# Altium PCB VCB2020.PcbDoc (part 1 of 3)
Units mm, origin at the board's own origin, x right, y up, seen from the top; angles counter-clockwise.
Board outline 146 x 96 mm, 2 copper layers (Top Layer, Bottom Layer); 155 components, 105 nets, 540 pads, 1006 vias.
Unrouted connection lines stored in the file: 5.
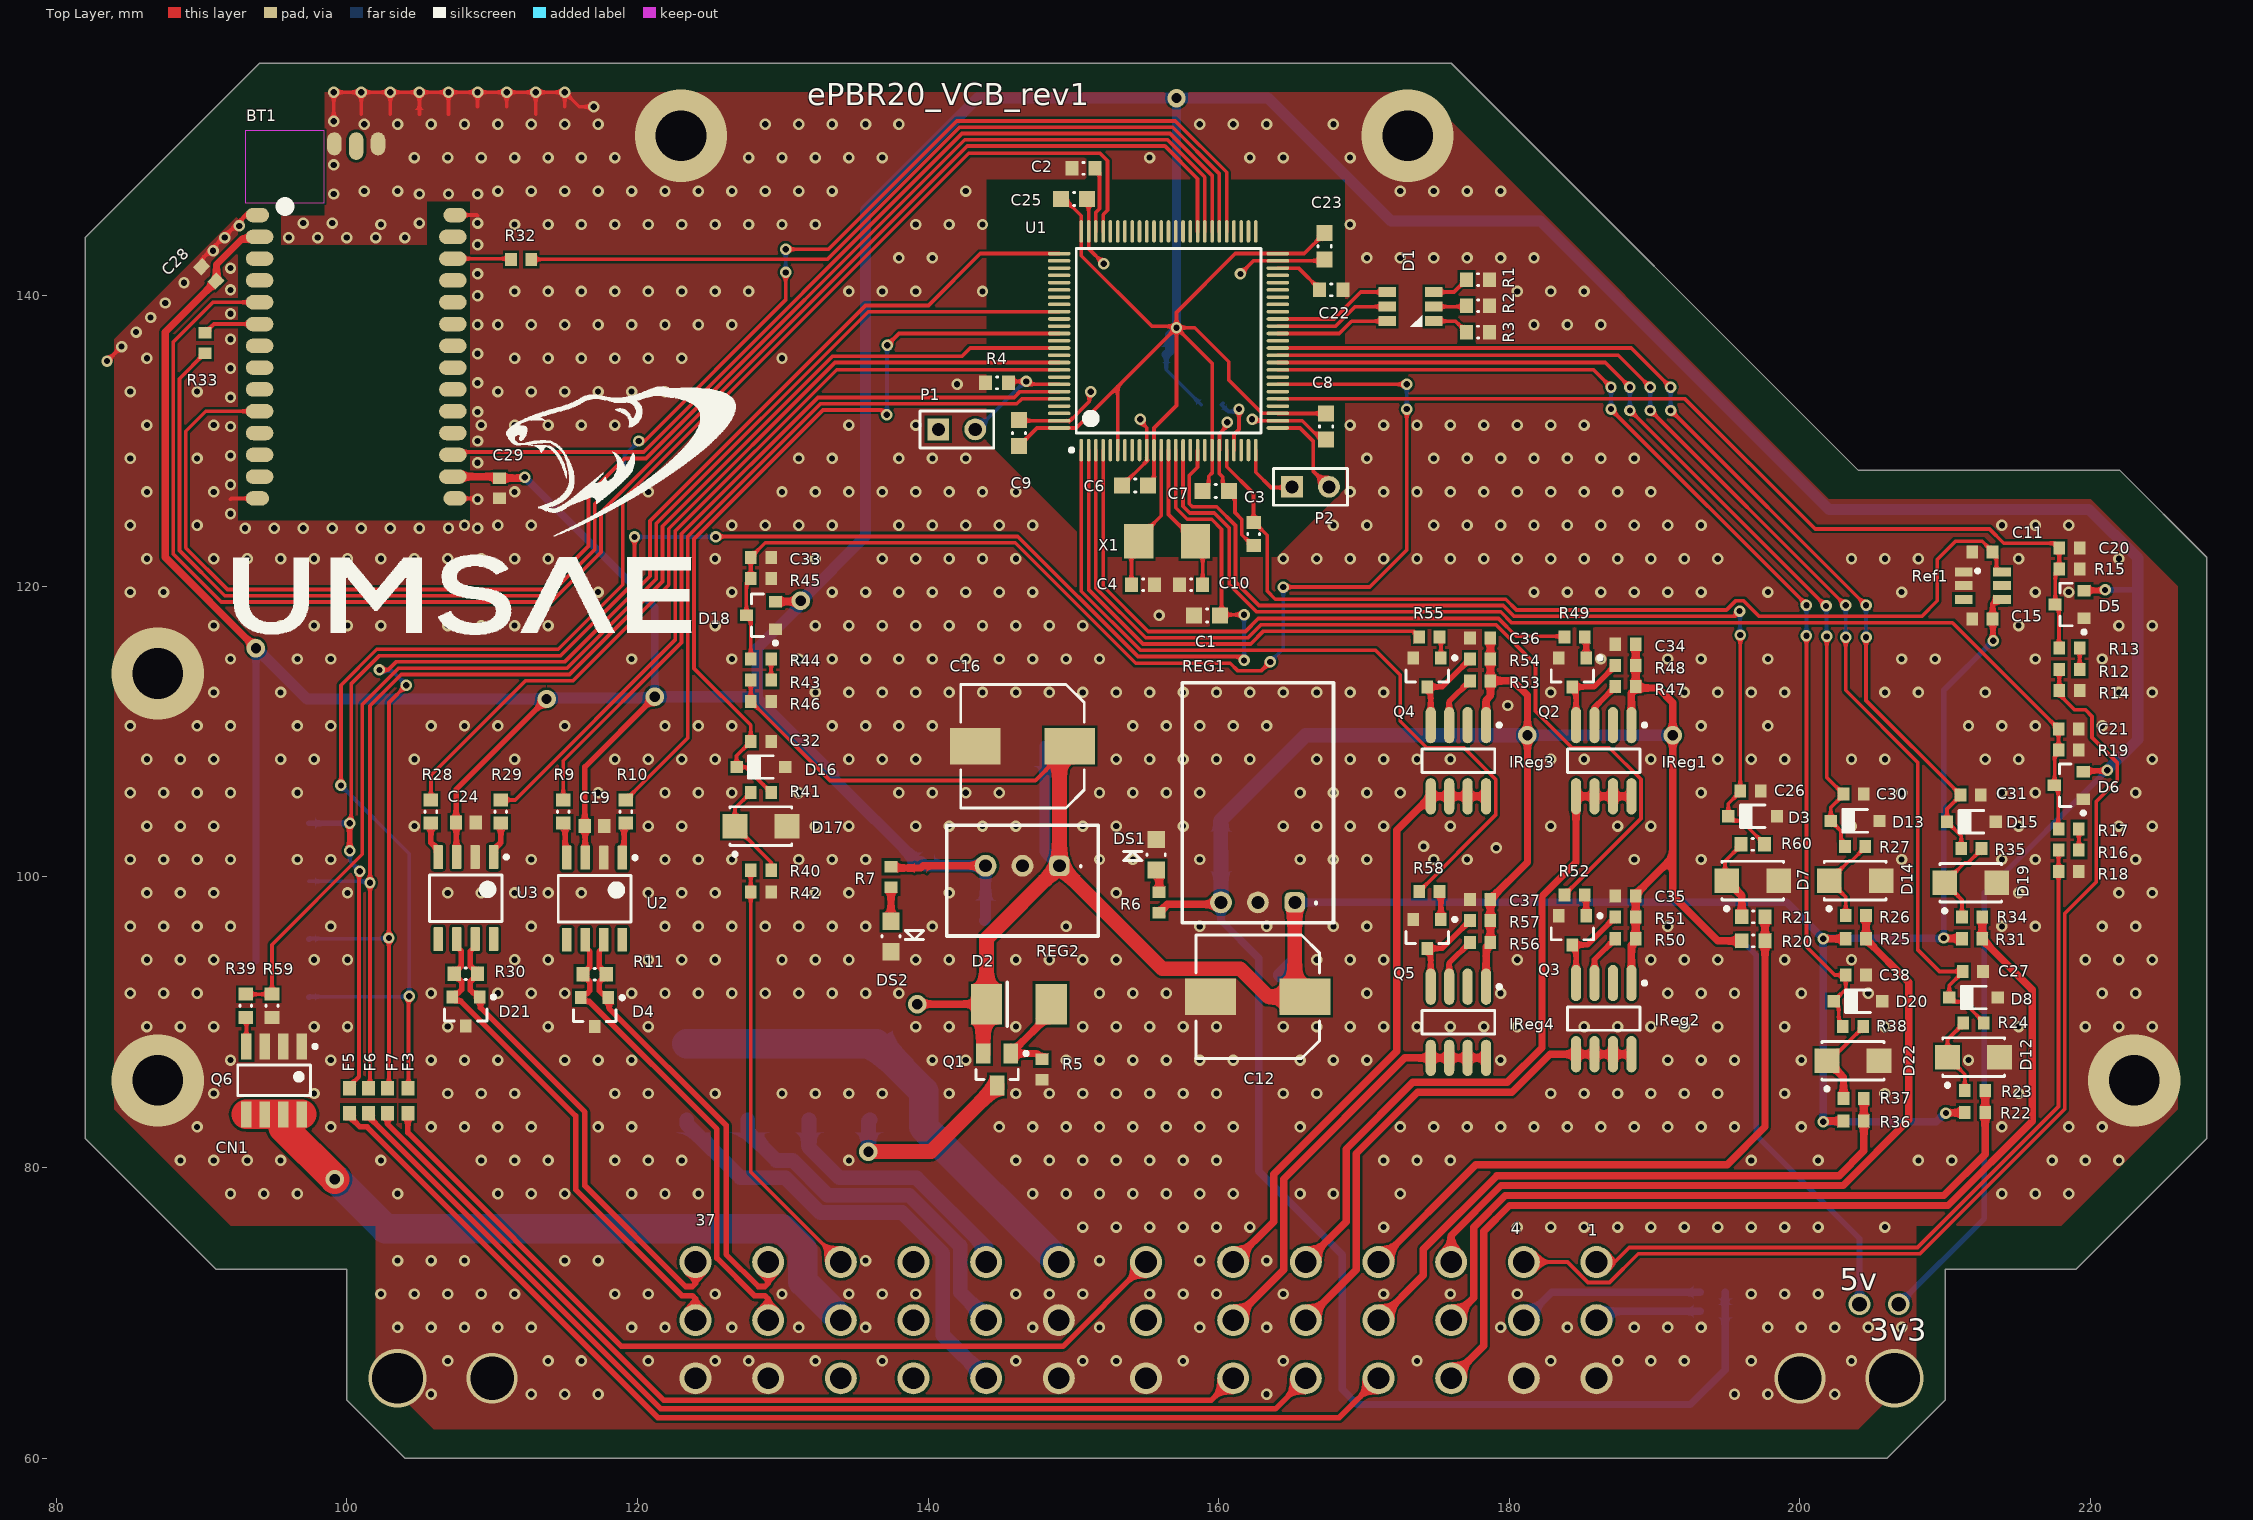
[diagram p0: Top Layer view]
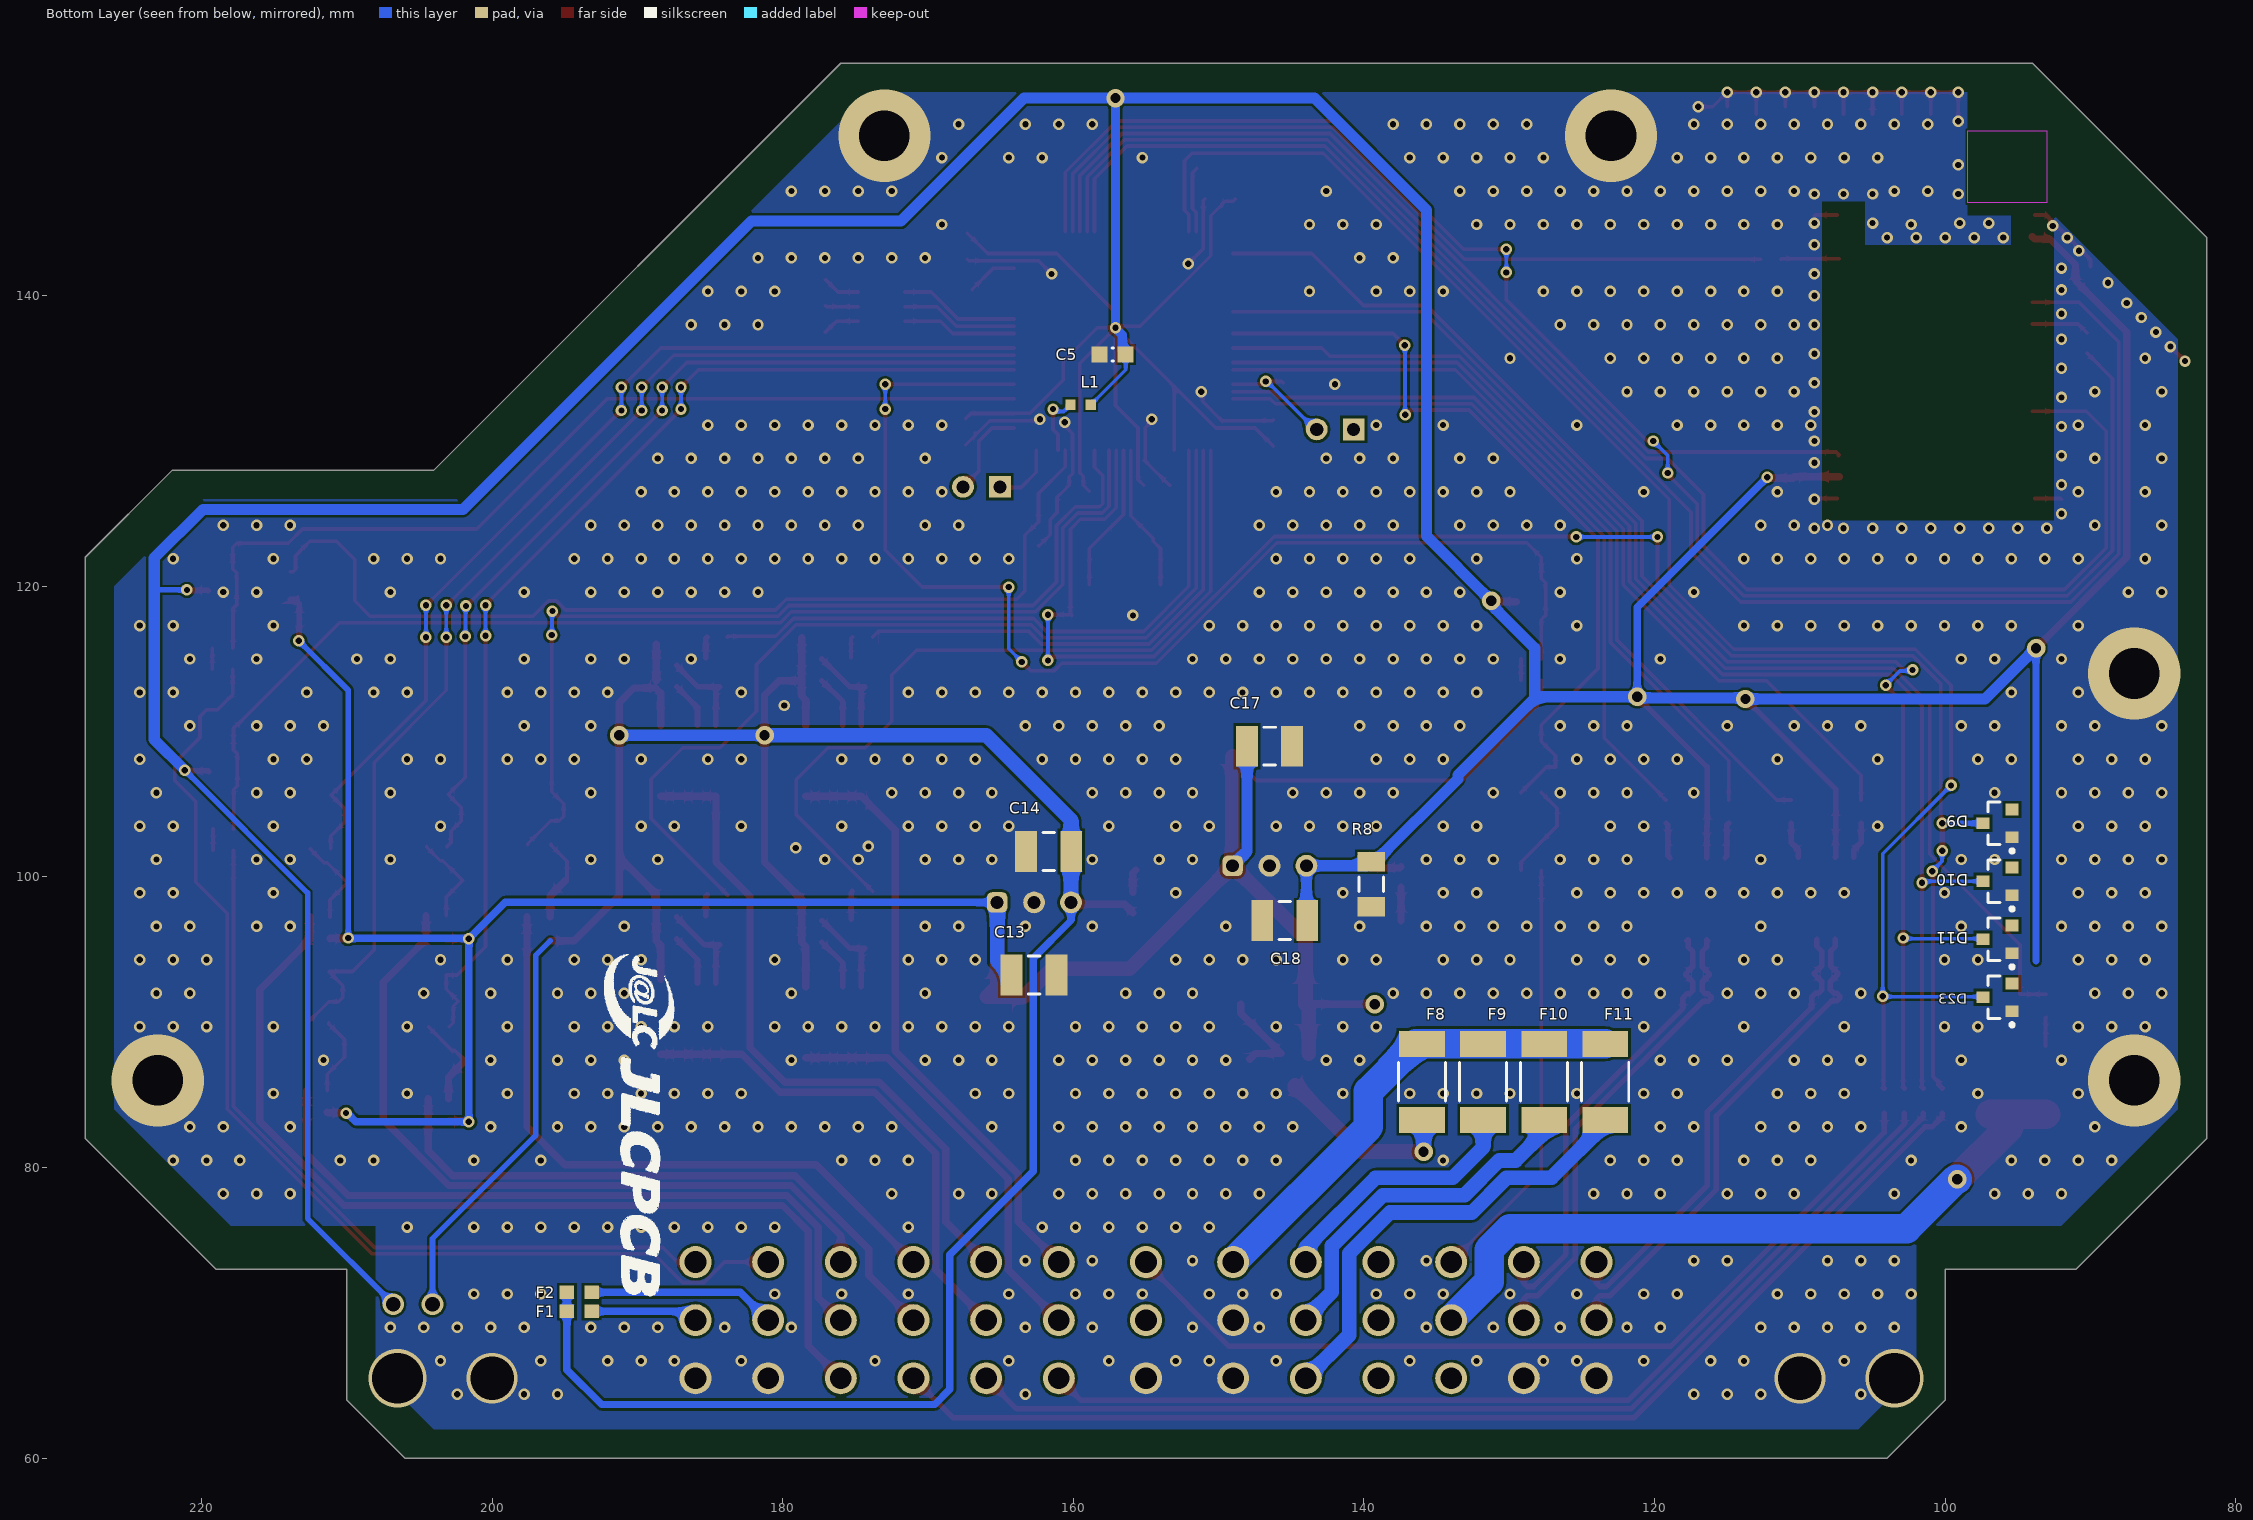
[diagram p1: Bottom Layer view, seen from below]

## Layer stack, top to bottom
Top Solder: solder mask 0.0102, Solder Resist, Dk 3.5
Top Layer: signal copper 0.0356
Dielectric 1: dielectric 0.32, FR-4, Dk 4.8
Bottom Layer: signal copper 0.0356
Bottom Solder: solder mask 0.0102, Solder Resist, Dk 3.5

## Board outline
98.5,156 94,156 82,144 82,82 91,73 100,73 100,64 104,60 206,60 210,64 210,73 219,73 228,82 228,122 222,128 204,128 176,156

## Design rules (kind name [scope] priority, off if disabled: settings)
Clearance [All] p1: gap=0.178 ignorepadtopadclearanceinfootprint=FALSE except(0: Arc-Hole Track-Hole SMDPad-Hole THPad-Hole Via-Hole Fill-Hole Poly-Hole Region-Hole Text-Hole)
DiffPairsRouting [All] p1: maxlimit=0.254 minlimit=0.254 mostfreqgap=0.254 toplayer_minwidth=0.381 toplayer_maxwidth=0.381 toplayer_prefwidth=0.381 bottomlayer_minwidth=0.381 bottomlayer_maxwidth=0.381 bottomlayer_prefwidth=0.381 maxuncoupledlength=12.7
Height [All] p1: minheight=0 maxheight=1000 prefheight=12.7
HoleSize [All] p1: absolutevalues=TRUE maxlimit=5.08 minlimit=0.381 maxpercent=80.000 minpercent=20.000
HoleToHoleClearance [All] p1: gap=0.203 allowstackedmicrovias=TRUE
MinimumAnnularRing MinimumAnnularRing_Pad [IsPad] p1: minimumring=0.178
MinimumAnnularRing MinimumAnnularRing_Via [IsVia] p2: minimumring=0.127
MinimumSolderMaskSliver [All] p1: minsoldermaskwidth=0.102
PlaneClearance [All] p1: clearance=0.381
PlaneConnect PlaneConnect_12V [InNet('12V')] p1: planeconnectstyle=Direct reliefexpansion=0.508 reliefentries=4 reliefconductorwidth=0.508 reliefairgap=0.254
PlaneConnect PlaneConnect_1 [All] p2: planeconnectstyle=Relief reliefexpansion=0.381 reliefentries=4 reliefconductorwidth=0.381 reliefairgap=0.254
PolygonConnect [All] p1: connectstyle=Direct reliefconductorwidth=0.381 reliefentries=4 polygonreliefangle="90 Angle" airgapwidth=0.254
RoutingVias [All] p1: holewidth=0.432 width=0.787 viastyle="Through Hole" minholewidth=0.381 minwidth=0.737 maxholewidth=1.27 maxwidth=2.54
SilkToSilkClearance [All] p1: silktosilkclearance=0.178
SilkToSolderMaskClearance [IsPad] p1: minsilkscreentomaskgap=0.051 clearancetoexposedcopper=TRUE
SolderMaskExpansion [All] p1: expansion=0.076
Width [All] p1: maxlimit=5.08 minlimit=0.178 preferedwidth=0.381
21 further rules are at their usual default settings.

## Classes and differential pairs
component class 14-RegenSolenoid: Q6 R39 R59
component class 13-Fusing: F8 F9 F10 F11
component class 12-Dash_Inputs: C27 C30 C31 C38 D8 D12 D13 D14 D15 D19 D20 D22 R22 R23 R24 R25 R26 R27 R31 R34 R35 R36 R37 R38
component class 10-DashLEDs: C34 C35 C36 C37 IReg1 IReg2 IReg3 IReg4 Q2 Q3 Q4 Q5 R47 R48 R49 R50 R51 R52 R53 R54 R55 R56 R57 R58
component class 9-Other_Inputs: C26 C32 C33 D3 D7 D16 D17 D18 R20 R21 R40 R41 R42 R43 R44 R45 R46 R60
component class 8-Bluetooth: BT1 C28 C29 R32 R33
component class 5-Connector: CN1 D9 D10 D11 F1 F2 F5 F6 F7
component class 4-PPS: C20 C21 D5 D6 R12 R13 R14 R15 R16 R17 R18 R19
component class 3-CAN: C19 C24 D4 D21 R9 R10 R11 R28 R29 R30 U2 U3
component class 2-Power: C11 C12 C13 C14 C15 C16 C17 C18 D2 DS1 DS2 Q1 R5 R6 R7 R8 Ref1 REG1 REG2
component class 1-Controller: C1 C2 C3 C4 C5 C6 C7 C8 C9 C10 C22 C23 C25 D1 L1 P1 P2 R1 R2 R3 R4 U1 X1
differential pair Sensor_CAN: +Sensor_CAN_P -Sensor_CAN_N
differential pair CAN: +CAN_P -CAN_N

## Components (designator, comment, footprint, x,y, rotation, side; value= is the part's Value field where it differs from the comment)
BT1 "WT12" WT12 100.65,142.95 r270 top
C1 "CAP 10nF 100V 0603(1608)" CAPC0603(1608)100_M 159.2,117.996 r0 top value=10nF
C2 "CAP 2.2uF" CAPC0603(1608)55_N 150.7,148.759 r0 top value=2.2uF
C3 "CAP 100nF 25V 0603(1608)" CAPC0603(1608)100_N 162.4,123.6 r90 top value=100nF
C4 "CAP 24pF" CAPC0603(1608)100_N 154.796,120.1 r180 top value=24pF
C5 "CAP 10nF 100V 0603(1608)" CAPC0603(1608)100_M 157.3,135.95 r180 bottom value=10nF
C6 "CAP 10nF 100V 0603(1608)" CAPC0603(1608)100_M 154.25,126.95 r0 top value=10nF
C7 "CAP 10nF 100V 0603(1608)" CAPC0603(1608)100_M 159.8,126.55 r180 top value=10nF
C8 "CAP 10nF 100V 0603(1608)" CAPC0603(1608)100_M 167.4,131 r90 top value=10nF
C9 "CAP 10nF 100V 0603(1608)" CAPC0603(1608)100_M 146.25,130.55 r270 top value=10nF
C10 "CAP 24pF" CAPC0603(1608)100_N 158.1,120.1 r0 top value=24pF
C11 "Cap" 1608[0603] 212.55,122.354 r0 top value=1uF
C12 "UUD1H101MNL1GS" NIC-CAPA2-8X10_V 162.7,91.75 r180 top
C13 "Cap" C1210_M 162.7,93.25 r0 bottom value=22uF
C14 "Cap" C1210_M 161.7,101.75 r180 bottom value=10uF
C15 "Cap" 1608[0603] 212.55,117.746 r0 top value=100nF
C16 "UUD1H101MNL1GS" NIC-CAPA2-8X10_V 146.5,109 r180 top
C17 "Cap" C1210_M 146.5,109 r0 bottom value=22uF
C18 "Cap" C1210_M 145.45,97 r180 bottom value=10uF
C19 "0.1uF" CAPC1608X90X30NL10T20 117.054,103.509 r180 top
C20 "Cap" 1608[0603] 218.55,122.644 r180 top value=0.47uF
C21 "Cap" 1608[0603] 218.5,110.194 r180 top value=0.47uF
C22 "CAP 2.2uF 10V 0603(1608)" CAPC0603(1608)55_N 167.75,140.4 r180 top value=2.2uF
C23 "CAP 10nF 100V 0603(1608)" CAPC0603(1608)100_M 167.3,143.404 r90 top value=10nF
C24 "0.1uF" CAPC1608X90X30NL10T20 108.196,103.75 r180 top
C25 "CAP 10nF 100V 0603(1608)" CAPC0603(1608)100_M 150.05,146.654 r180 top value=10nF
C26 "Cap" 1608[0603] 196.6,105.921 r180 top value=10nF
C27 "Cap" 1608[0603] 211.9,93.5 r180 top value=100nF
C28 "Cap" 1608[0603] 90.5,141.5 r315 top value=100nF
C29 "Cap" 1608[0603] 110.5,126.75 r90 top value=100nF
C30 "Cap" 1608[0603] 203.7,105.7 r180 top value=100nF
C31 "Cap" 1608[0603] 211.75,105.65 r180 top value=100nF
C32 "Cap" 1608[0603] 128.5,109.321 r180 top value=1nF
C33 "Cap" 1608[0603] 128.5,121.996 r180 top value=0.47uF
C34 "Cap" 1608[0603] 188,116.013 r0 top value=100nF
C35 "Cap" 1608[0603] 188,98.704 r0 top value=100nF
C36 "Cap" 1608[0603] 178,116.454 r0 top value=100nF
C37 "Cap" 1608[0603] 178,98.454 r0 top value=100nF
C38 "Cap" 1608[0603] 203.85,93.25 r180 top value=100nF
CN1 "5-1418363-3" 5-1418363-3 155,69.5 r0 top
D1 "CLX6F-FKC-CNP1ST1E1BB7D3D3" CLX6C-FKB 174.8,139.25 r180 top
D2 "Zener Diode, 5.1V, 5W SMBJ5338B" "DO-214AA (SMB)" 146.25,91.25 r180 top
D3 "MMSZ5226B-E3-08" VISH-SOD-123-2_V 196.75,104.167 r180 top
D4 "NUP2105LT1" ONSC-SOT-23-3-318-08_V 117.054,90.696 r270 top
D5 "SZNUP1301ML3T1G" ONSC-SOT-23-3-318-08_V 218.55,118.75 r180 top
D6 "SZNUP1301ML3T1G" ONSC-SOT-23-3-318-08_V 218.5,106.3 r180 top
D7 "SS14-E3/5AT" VISH-DO-214AC-2_V 196.75,99.75 r180 top
D8 "MMSZ5226B-E3-08" VISH-SOD-123-2_V 211.95,91.704 r180 top
D9 "SZNUP1301ML3T1G" ONSC-SOT-23-3-318-08_V 96.4,103.689 r0 bottom
D10 "SZNUP1301ML3T1G" ONSC-SOT-23-3-318-08_V 96.4,99.7 r0 bottom
D11 "SZNUP1301ML3T1G" ONSC-SOT-23-3-318-08_V 96.4,95.711 r0 bottom
D12 "SS14-E3/5AT" VISH-DO-214AC-2_V 211.95,87.6 r180 top
D13 "MMSZ5226B-E3-08" VISH-SOD-123-2_V 203.8,103.854 r180 top
D14 "SS14-E3/5AT" VISH-DO-214AC-2_V 203.8,99.75 r180 top
D15 "MMSZ5226B-E3-08" VISH-SOD-123-2_V 211.8,103.8 r180 top
D16 "MMSZ5226B-E3-08" VISH-SOD-123-2_V 128.5,107.567 r180 top
D17 "SS14-E3/5AT" VISH-DO-214AC-2_V 128.5,103.5 r180 top
D18 "SZNUP1301ML3T1G" ONSC-SOT-23-3-318-08_V 128.5,118 r180 top
D19 "SS14-E3/5AT" VISH-DO-214AC-2_V 211.75,99.6 r180 top
D20 "MMSZ5226B-E3-08" VISH-SOD-123-2_V 204,91.454 r180 top
D21 "NUP2105LT1" ONSC-SOT-23-3-318-08_V 108.196,90.737 r270 top
D22 "SS14-E3/5AT" VISH-DO-214AC-2_V 203.65,87.35 r180 top
D23 "SZNUP1301ML3T1G" ONSC-SOT-23-3-318-08_V 96.4,91.721 r0 bottom
DS1 "LTST-C170GKT" LTST-C170GKT_V 155.7,101.529 r90 top
DS2 "LTST-C170GKT" LTST-C170GKT_V 137.45,95.916 r270 top
F1 "PTC 80 mA" "0603 fuse" 194,70.113 r180 bottom
F2 "PTC 80 mA" "0603 fuse" 194,71.42 r180 bottom
F3 "PTC 80 mA" "0603 fuse" 104.2,84.6 r270 top
F5 "PTC 80 mA" "0603 fuse" 100.193,84.6 r270 top
F6 "PTC 80 mA" "0603 fuse" 101.5,84.6 r270 top
F7 "PTC 80 mA" "0603 fuse" 102.807,84.6 r270 top
F8 "1812L075/24DR" LFUS-1812L07524DR_V 136,85.9 r270 bottom
F9 "1812L050/30PR" LFUS-1812L05030PR_V 131.8,85.9 r270 bottom
F10 "1812L050/30PR" LFUS-1812L05030PR_V 127.6,85.9 r270 bottom
F11 "1812L075/24DR" LFUS-1812L07524DR_V 123.4,85.9 r270 bottom
IReg1 "NUD4001" SO8_M 186.5,108 r270 top
IReg2 "NUD4001" SO8_M 186.5,90.25 r270 top
IReg3 "NUD4001" SO8_M 176.5,108 r270 top
IReg4 "NUD4001" SO8_M 176.5,90 r270 top
L1 "MH1608-601Y" BOUR-MH1608_V 159.5,132.5 r0 bottom
P1 "Header 2" HDR1X2 140.71,130.8 r0 top
P2 "Header 2" HDR1X2 165.05,126.85 r0 top
Q1 "FDN340P" FAIR-SSOT3L-3_V 144.75,86.75 r270 top
Q2 "MMBT2222ALT1" ONSC-SOT-23-3-318-08_V 184.346,114.079 r270 top
Q3 "MMBT2222ALT1" ONSC-SOT-23-3-318-08_V 184.346,96.329 r270 top
Q4 "MMBT2222ALT1" ONSC-SOT-23-3-318-08_V 174.346,114.079 r270 top
Q5 "MMBT2222ALT1" ONSC-SOT-23-3-318-08_V 174.346,96.079 r270 top
Q6 "IRF7413PBFCT" INTR-SO-8_V 95,86 r270 top
R1 "82R" RESC0603(1608)_N 177.85,141.109 r0 top value="82.00 Ohm"
R2 "60R" RESC0603(1608)_N 177.85,139.304 r0 top value="60.40 Ohm"
R3 "33R" RESC0603(1608)_N 177.85,137.5 r0 top value="33.00 Ohm"
R4 "10K" RESC0603(1608)_N 144.75,134 r180 top value="10000.00 Ohm"
R5 "Res1" 1608[0603] 147.854,86.75 r90 top value=1K
R6 "Res1" 1608[0603] 155.904,98.25 r90 top value=180R
R7 "Res1" 1608[0603] 137.45,100 r270 top value=82R
R8 "100R" RESC1206(3216)_M 139.5,99.5 r90 bottom value="100.00 Ohm"
R9 "22R" RESC0603(1608)_N 114.9,104.5 r90 top value="22.00 Ohm"
R10 "22R" RESC0603(1608)_N 119.209,104.5 r90 top value="22.00 Ohm"
R11 "120R" RESC0603(1608)_N 117.054,93.3 r0 top value="120.00 Ohm"
R12 "Res1" 1608[0603] 218.55,114.291 r0 top value=3k9
R13 "Res1" 1608[0603] 218.55,115.746 r180 top value=1k3
R14 "Res1" 1608[0603] 218.55,112.837 r180 top value=10k
R15 "Res1" 1608[0603] 218.55,121.189 r180 top value=10k
R16 "Res1" 1608[0603] 218.5,101.841 r0 top value=3k9
R17 "Res1" 1608[0603] 218.5,103.296 r180 top value=1k3
R18 "Res1" 1608[0603] 218.5,100.387 r180 top value=10k
R19 "Res1" 1608[0603] 218.5,108.739 r180 top value=10k
R20 "100K 5% 0603(1608)" RESC0603(1608)_N 196.8,95.6 r180 top value="100000.00 Ohm"
R21 "51K 5% 0603(1608)" RESC0603(1608)_N 196.8,97.25 r180 top value="51000.00 Ohm"
R22 "Res1" 1608[0603] 212.05,83.8 r180 top value=10k
R23 "Res1" 1608[0603] 212.05,85.3 r180 top value=5k1
R24 "Res1" 1608[0603] 211.95,89.95 r0 top value=5k1
R25 "Res1" 1608[0603] 203.85,95.75 r180 top value=10k
R26 "Res1" 1608[0603] 203.85,97.35 r180 top value=5k1
R27 "Res1" 1608[0603] 203.8,102.1 r180 top value=5k1
R28 "22R" RESC0603(1608)_N 105.791,104.5 r90 top value="22.00 Ohm"
R29 "22R" RESC0603(1608)_N 110.6,104.5 r90 top value="22.00 Ohm"
R30 "120R" RESC0603(1608)_N 108.196,93.341 r0 top value="120.00 Ohm"
R31 "Res1" 1608[0603] 211.85,95.75 r180 top value=10k
R32 "Res1" 1608[0603] 112,142.5 r0 top value=22R
R33 "Res1" 1608[0603] 90.25,136.75 r90 top value=22R
R34 "Res1" 1608[0603] 211.85,97.25 r180 top value=5k1
R35 "Res1" 1608[0603] 211.8,101.95 r180 top value=5k1
R36 "Res1" 1608[0603] 203.7,83.2 r180 top value=10k
R37 "Res1" 1608[0603] 203.7,84.75 r180 top value=5k1
R38 "Res1" 1608[0603] 203.65,89.7 r180 top value=5k1
R39 "100R 1% 0603(1608)" RESC0603(1608)_N 93.05,91.134 r90 top value="100.00 Ohm"
R40 "Res1" 1608[0603] 128.5,100.463 r180 top value=1K
R41 "Res1" 1608[0603] 128.5,105.812 r180 top value=1K
R42 "Res1" 1608[0603] 128.5,98.963 r180 top value=1K
R43 "Res1" 1608[0603] 128.5,113.541 r0 top value=39k
R44 "Res1" 1608[0603] 128.5,114.996 r180 top value=2k
R45 "Res1" 1608[0603] 128.5,120.541 r180 top value=10k
R46 "Res1" 1608[0603] 128.5,112.087 r180 top value=10k
R47 "Res1" 1608[0603] 188,113.104 r180 top value=3R
R48 "Res1" 1608[0603] 188,114.559 r180 top value=110k
R49 "Res1" 1608[0603] 184.5,116.509 r180 top value=1K
R50 "Res1" 1608[0603] 188,95.75 r180 top value=3R
R51 "Res1" 1608[0603] 188,97.25 r180 top value=110k
R52 "Res1" 1608[0603] 184.5,98.759 r180 top value=1K
R53 "Res1" 1608[0603] 178,113.5 r180 top value=3R
R54 "Res1" 1608[0603] 178,115 r180 top value=110k
R55 "Res1" 1608[0603] 174.5,116.509 r180 top value=1K
R56 "Res1" 1608[0603] 178,95.5 r180 top value=3R
R57 "Res1" 1608[0603] 178,97 r180 top value=110k
R58 "Res1" 1608[0603] 174.5,99 r180 top value=1K
R59 "10K 1% 0603(1608)" RESC0603(1608)_N 94.854,91.134 r90 top value="10000.00 Ohm"
R60 "51K 5% 0603(1608)" RESC0603(1608)_N 196.75,102.237 r0 top value="51000.00 Ohm"
Ref1 "LT6654AHS6-3.3" "TSOT-23 S6" 212.55,120.05 r0 top
REG1 "OKI-78SR-5" "Reg - TH, 3 pin, 100 mil Pitch, HTL" 162.7,96.98 r180 top
REG2 "OKI-78SR-3.3" "Reg - TH, 3 pin, 100 mil Pitch, VTL" 146.5,99.5 r180 top
U1 "STM32F446VET7" STM-LQFP100_L 156.55,136.9 r90 top
U2 "SN65HVD232DR" D0008A_M 117.054,98.504 r270 top
U3 "SN65HVD232DR" D0008A_M 108.196,98.546 r270 top
X1 "7A-8.000MAAJ-T" "2-SMD, No Lead" 156.4,123.1 r180 top

## Footprints (in the part's own frame and the unit in brackets; to place one, negate y for a bottom-side part, rotate by r counter-clockwise, add the part's x,y. Pads: shape width x height; smd on the part's side, far side on the other; paste and mask are expansions set on the pad)
"2-SMD, No Lead" [mm]
  rect 2x2.4 smd: 1(-2,0) 2(1.9,0)
  body extent -2.5,-1.6 2.5,1.6, height 1.2
5-1418363-3 [mm] "Levyseal 90 degree 39 pin header"
  round 2.2 hole 1.5: 1(31,4) 2(31,0) 3(31,-4) 4(26,4) 5(26,0) 6(26,-4) 7(21,4) 8(21,0) 9(21,-4) 10(16,4) 11(16,0) 12(16,-4) 13(11,4) 14(11,0) 15(11,-4) 16(6,4) 17(6,0) 18(6,-4) 19(0,4) 20(0,0) 21(0,-4) 22(-6,4) 23(-6,0) 24(-6,-4) 25(-11,4) 26(-11,0) 27(-11,-4) 28(-16,4) 29(-16,0) 30(-16,-4) 31(-21,4) 32(-21,0) 33(-21,-4) 34(-26,4) 35(-26,0) 36(-26,-4) 37(-31,4) 38(-31,0) 39(-31,-4)
  body extent -66,-47.4 66,10.4, height 37
"0603 fuse" [mm] "0603 PTC fuse"
  rect 1x0.9 smd: 1(-0.85,0) 2(0.85,0)
  body extent -1,-0.41 1,0.41, height 0.7
1608[0603] [mm] "Chip Capacitor, Body 1.6x0.8mm, IPC High Density"
  rect 0.8x0.9 smd: 1(-0.7,0) 2(0.7,0)
  body extent -0.87,-0.48 0.87,0.48, height 1.3
BOUR-MH1608_V [mm] "Chip Bead, 2-Leads, Body 1.6x0.8mm"
  rect 0.7x0.7 smd: 1(-0.7,0) 2(0.7,0)
  body extent -0.8,-0.38 0.8,0.42, height 0.8
C1210_M [mm] "Chip Capacitor, Body 3.2x2.5mm, IPC Low Density"
  rect 1.5x2.8 smd: 1(-1.55,0) 2(1.55,0)
  silkscreen extent -0.4,-1.3 0.4,1.3, body extent -1.7,-1.35 1.7,1.35, height 1.5
CAPC0603(1608)55_N [mm] "Chip Capacitor, Body 1.6x0.8mm, Height 0.55mm, IPC Medium Density"
  rect 0.9x1 smd: 1(-0.8,0) 2(0.8,0)
  silkscreen extent -0.05,-0.4 0.05,0.4, body extent -0.87,-0.48 0.88,0.47, height 0.55
CAPC0603(1608)100_M [mm] "Chip Capacitor, Body 1.6x0.8mm, Height 1.0mm, IPC Low Density"
  rect 1.1x1.1 smd: 1(-0.9,0) 2(0.9,0)
  silkscreen extent -0.05,-0.45 0.05,0.45, body extent -0.87,-0.47 0.88,0.48, height 1
CAPC0603(1608)100_N [mm] "Chip Capacitor, Body 1.6x0.8mm, Height 1.0mm, IPC Medium Density"
  rect 0.9x1 smd: 1(-0.8,0) 2(0.8,0)
  silkscreen extent -0.05,-0.4 0.05,0.4, body extent -0.87,-0.48 0.88,0.47, height 1
CAPC1608X90X30NL10T20 [mm] "Chip Capacitor, 2-Leads, Body 1.70x0.90mm, IPC Medium Density"
  rect 0.85x0.95 smd: 1(-0.675,0) 2(0.675,0)
  body extent -0.85,-0.45 0.85,0.45, height 0.9
CLX6C-FKB [mm] "6-SMD, J-Lead, 1mm"
  rect 1.2x0.7 smd: 1(0,1) 2(0,0) 3(0,-1) 4(3.2,-1) 5(3.2,0) 6(3.2,1)
  silkscreen extent 0.8,0.6 1.6,1.4, body extent -0.1,-1.7 3.3,1.7, height 1
D0008A_M [mm] "SOIC, 8-Leads, Body 5x4mm, Pitch 1.27mm, IPC Low Density"
  rrect15% 1.65x0.65 smd: 1(-2.825,1.905) 2(-2.825,0.635) 3(-2.825,-0.635) 4(-2.825,-1.905) 5(2.825,-1.905) 6(2.825,-0.635) 7(2.825,0.635) 8(2.825,1.905)
  silkscreen extent -2.95,-2.5 1.6,2.91, body extent -3,-2.45 3,2.45, height 1.63
"DO-214AA (SMB)" [mm]
  rect 2.16x2.8 smd: A(-2.225,0) K(2.225,0)
  silkscreen extent 0.8,-1.5 0.8,1.5, body extent -2.87,-1.95 2.88,1.95, height 2.41
FAIR-SSOT3L-3_V [mm] "SOT23, 3-Leads, Body 2.92x1.4mm, Pitch 0.95mm"
  rect 1.4x1 smd: 1(-1.1,0.95) 2(-1.1,-0.95) 3(1.1,0)
  silkscreen extent -1.22,-1.46 0.7,2.13, body extent -1.26,-1.46 1.26,1.46, height 1.12
HDR1X2 [mm] "Connector; Header; 2 Position"
  rect 1.5x1.5 hole 0.9: 1(0,0)
  round 1.5 hole 0.9: 2(2.54,0)
  silkscreen extent -1.27,-1.27 3.81,1.27
INTR-SO-8_V [mm] "SOIC, 8-Leads, Body 5x4mm, Pitch 1.27mm"
  rect 1.78x0.72 smd: 1(-2.34,1.905) 2(-2.34,0.635) 3(-2.34,-0.635) 4(-2.34,-1.905) 5(2.34,-1.905) 6(2.34,-0.635) 7(2.34,0.635) 8(2.34,1.905)
  silkscreen extent -2.46,-2.5 1.05,2.94, body extent -3,-2.5 3,2.5, height 1.75
LFUS-1812L05030PR_V [mm] "SMD, 2-Leads, Body 4.55x3.24mm"
  rect 1.78x3.15 smd: 1(-2.615,0) 2(2.615,0)
  silkscreen extent -1.33,-1.62 1.33,1.62, body extent -2.27,-1.62 2.27,1.62, height 1
LFUS-1812L07524DR_V [mm] "SMD, 2-Leads, Body 4.55x3.24mm"
  rect 1.78x3.15 smd: 1(-2.615,0) 2(2.615,0)
  silkscreen extent -1.33,-1.62 1.33,1.62, body extent -2.27,-1.62 2.27,1.62, height 1.55
LTST-C170GKT_V [mm] "SMD, 2-Leads, Body 2x1.25mm"
  rect 1.2x1.2 smd: 1(-1.05,0) 2(1.05,0)
  silkscreen extent -0.41,-0.63 0.23,2.25, body extent -1,-0.63 1,0.63, height 1.1
NIC-CAPA2-8X10_V [mm] "Aluminum Electrolytic Capacitor, Diameter 8mm, Height 10.8mm, Pitch 6.5mm"
  rect 3.5x2.5 smd: 1(-3.25,0) 2(3.25,0)
  silkscreen extent -4.25,-4.25 4.25,4.25, body extent -3.99,-3.97 3.99,4, height 10.8
ONSC-SOT-23-3-318-08_V [mm] "SOT23, 3-Leads, Body 2.92x1.3mm, Pitch 0.95mm"
  rect 0.9x0.8 smd: 1(-1,0.95) 2(-1,-0.95) 3(1,0)
  silkscreen extent -1.12,-1.46 0.65,2.03, body extent -0.65,-1.46 0.65,1.46, height 1.11
"Reg - TH, 3 pin, 100 mil Pitch, HTL" [mm] "OKI-78SR"
  rrect50% 1.4x1.4 hole 0.889: 1(-2.54,-1.27)
  round 1.5 hole 0.889: 2(0,-1.27) 3(2.54,-1.27)
  silkscreen extent -5.21,-16.38 5.21,0.13, body extent -5.28,-16.46 5.13,0.05, height 7.67
"Reg - TH, 3 pin, 100 mil Pitch, VTL" [mm] "OKI-78SR"
  rrect50% 1.4x1.4 hole 0.889: 1(-2.54,-1.27)
  round 1.5 hole 0.889: 2(0,-1.27) 3(2.54,-1.27)
  silkscreen extent -5.21,-4.06 5.21,3.56, body extent -5.21,-4.05 5.21,3.68, height 16.51
RESC0603(1608)_N [mm] "Chip Resistor, Body 1.6x0.8mm, IPC Medium Density"
  rect 0.9x1 smd: 1(-0.8,0) 2(0.8,0)
  silkscreen extent -0.05,-0.4 0.05,0.4, body extent -0.85,-0.47 0.85,0.47, height 0.6
RESC1206(3216)_M [mm] "Chip Resistor, Body 3.2x1.6mm, IPC Low Density"
  rect 1.35x1.9 smd: 1(-1.55,0) 2(1.55,0)
  silkscreen extent -0.5,-0.85 0.5,0.85, body extent -1.67,-0.87 1.67,0.87, height 0.75
SO8_M [mm] "SOIC, 8-Leads, Body 4.9x3.9mm, Pitch 1.27mm, IPC Low Density"
  oval 2.5x0.7 smd: 1(-2.45,1.905) 2(-2.45,0.635) 3(-2.45,-0.635) 4(-2.45,-1.905) 5(2.45,-1.905) 6(2.45,-0.635) 7(2.45,0.635) 8(2.45,1.905)
  silkscreen extent -2.57,-2.5 0.8,2.93, body extent -2,-2.5 2,2.5, height 1.75
STM-LQFP100_L [mm] "Thin QFP, 100-Leads, Body 14x14mm, Pitch 0.5mm, IPC High Density"
  oval 1.55x0.25 smd: 1(-7.525,6) 2(-7.525,5.5) 3(-7.525,5) 4(-7.525,4.5) 5(-7.525,4) 6(-7.525,3.5) 7(-7.525,3) 8(-7.525,2.5) 9(-7.525,2) 10(-7.525,1.5) 11(-7.525,1) 12(-7.525,0.5) 13(-7.525,0) 14(-7.525,-0.5) 15(-7.525,-1) 16(-7.525,-1.5) 17(-7.525,-2) 18(-7.525,-2.5) 19(-7.525,-3) 20(-7.525,-3.5) 21(-7.525,-4) 22(-7.525,-4.5) 23(-7.525,-5) 24(-7.525,-5.5) 25(-7.525,-6) 51(7.525,-6) 52(7.525,-5.5) 53(7.525,-5) 54(7.525,-4.5) 55(7.525,-4) 56(7.525,-3.5) 57(7.525,-3) 58(7.525,-2.5) 59(7.525,-2) 60(7.525,-1.5) 61(7.525,-1) 62(7.525,-0.5) 63(7.525,0) 64(7.525,0.5) 65(7.525,1) 66(7.525,1.5) 67(7.525,2) 68(7.525,2.5) 69(7.525,3) 70(7.525,3.5) 71(7.525,4) 72(7.525,4.5) 73(7.525,5) 74(7.525,5.5) 75(7.525,6)
  oval 0.25x1.55 smd: 26(-6,-7.525) 27(-5.5,-7.525) 28(-5,-7.525) 29(-4.5,-7.525) 30(-4,-7.525) 31(-3.5,-7.525) 32(-3,-7.525) 33(-2.5,-7.525) 34(-2,-7.525) 35(-1.5,-7.525) 36(-1,-7.525) 37(-0.5,-7.525) 38(0,-7.525) 39(0.5,-7.525) 40(1,-7.525) 41(1.5,-7.525) 42(2,-7.525) 43(2.5,-7.525) 44(3,-7.525) 45(3.5,-7.525) 46(4,-7.525) 47(4.5,-7.525) 48(5,-7.525) 49(5.5,-7.525) 50(6,-7.525) 76(6,7.525) 77(5.5,7.525) 78(5,7.525) 79(4.5,7.525) 80(4,7.525) 81(3.5,7.525) 82(3,7.525) 83(2.5,7.525) 84(2,7.525) 85(1.5,7.525) 86(1,7.525) 87(0.5,7.525) 88(0,7.525) 89(-0.5,7.525) 90(-1,7.525) 91(-1.5,7.525) 92(-2,7.525) 93(-2.5,7.525) 94(-3,7.525) 95(-3.5,7.525) 96(-4,7.525) 97(-4.5,7.525) 98(-5,7.525) 99(-5.5,7.525) 100(-6,7.525)
  silkscreen extent -7.65,-6.35 6.35,6.8, body extent -7,-7 7,7, height 1.6
"TSOT-23 S6" [mm]
  rect 1.22x0.62 smd: 1(-1.27,0.95) 2(-1.27,0) 3(-1.27,-0.95) 4(1.35,-0.95) 5(1.35,0) 6(1.35,0.95)
  silkscreen extent -0.43,0.9 -0.21,1.12, body extent -0.85,-1.45 0.89,1.45, height 1
VISH-DO-214AC-2_V [mm] "SMA, 2-Leads, Body 4.245x2.665mm, Height 2.29mm"
  rect 1.7x1.68 smd: 1(-1.79,0) 2(1.79,0)
  silkscreen extent -2.12,-1.33 2.12,2.06, body extent -2.57,-1.33 2.57,1.33, height 2.29
VISH-SOD-123-2_V [mm] "SMD, 2-Leads, Body 2.7x1.55mm, Height 1.35mm"
  rect 0.85x0.85 smd: 1(-1.675,0) 2(1.675,0)
  silkscreen extent -0.85,-0.77 0.85,0.78, body extent -1.35,-0.77 1.35,0.77, height 1.35
WT12 [mm] "Bluegiga WT12 Bluetooth Module"
  rrect100% 1x1.6 smd: 1(-2.6,-6.8) 14(16.9,-6.8) 15(16.9,6.8) 28(-2.6,6.8)
  rrect100% 1x1.9 smd: 2(-1.1,-6.65) 3(0.4,-6.65) 4(1.9,-6.65) 5(3.4,-6.65) 6(4.9,-6.65) 7(6.4,-6.65) 8(7.9,-6.65) 9(9.4,-6.65) 10(10.9,-6.65) 11(12.4,-6.65) 12(13.9,-6.65) 13(15.4,-6.65) 16(15.4,6.65) 17(13.9,6.65) 18(12.4,6.65) 19(10.9,6.65) 20(9.4,6.65) 21(7.9,6.65) 22(6.4,6.65) 23(4.9,6.65) 24(3.4,6.65) 25(1.9,6.65) 26(0.4,6.65) 27(-1.1,6.65)
  rrect100% 1.6x1 smd: 29(-7.5,1.5) 31(-7.5,-1.5)
  rrect100% 1.9x1 smd: 30(-7.35,0)
  Keep-Out Layer region: -8.4,-7.65 -3.45,-7.65 -3.45,-2.2 -8.4,-2.2
  silkscreen extent -3.33,-5.04 -3.05,-4.76, body extent -7.7,-7 17.9,7, height 2.5

## Part data
C1 C5 C6 C7 C8 C9 C23 C25: library part CMP-1035-02326-1, "CAP 10nF 100V ±20% 0603 (1608 Metric) Thickness 1mm SMD", Case-EIA=0603, Case-Metric=1608, Rated Voltage="100 V", Tolerance=±20%, Max Thickness="1 mm", Technology=SMT
C2 C22: library part CMP-1035-02757-1, "CAP 2.2uF 10V ±10% 0603 (1608 Metric) Thickness 0.55mm SMD", Case-EIA=0603, Case-Metric=1608, Rated Voltage="10 V", Supplier Part Number 1=490-4520-1-ND, Tolerance=±10%, Max Thickness="0.55 mm", Supplier 1=Digi-Key, Technology=SMT
C3: library part CMP-1035-02589-1, "CAP 100nF 25V ±20% 0603 (1608 Metric) Thickness 1mm SMD", Case-EIA=0603, Case-Metric=1608, Rated Voltage="25 V", Tolerance=±20%, Max Thickness="1 mm", Technology=SMT
C4 C10: library part CMP-1035-00843-1, "CAP 24pF 16V ±2% 0603 (1608 Metric) Thickness 1mm SMD", Case-EIA=0603, Case-Metric=1608, Rated Voltage="16 V", Tolerance=±2%, Max Thickness="1 mm", Technology=SMT
C11: "Capacitor", Capacitance=1µF, Manufacturer="Murata Electronics North America", Manufacturer Part Number=GRM188R61E105KA12D, Operating Temperature="-55°C ~ 85°C", Package / Case="0603 (1608 Metric)", Ratings=-, Supplier Part Number 1=490-3897-1-ND, Temperature Coefficient=X5R, Tolerance=±10%, Voltage - Rated=25V, Applications="General Purpose", Category=Capacitors, ComponentLink1Description=http://www.murata.com/~/media/webrenewal/support/library/catalog/products/capacitor/mlcc/c02e.pdf, ComponentLink1URL=http://www.murata.com/~/media/webrenewal/support/library/catalog/products/capacitor/mlcc/c02e.pdf, Features=-, Height - Seated (Max)=-, Lead Spacing=-, Lead Style=-, Mounting Type="Surface Mount, MLCC", Packaging="Cut Tape (CT)", Part Status=Active, Pricing 1="1=0.15, 10=0.053, 50=0.0288, 100=0.0242, 250=0.01984, 500=0.01696, 1000=0.0132 (CAD)", RoHS="RoHS Compliant", Size / Dimension="0.063\" L x 0.031\" W (1.60mm x 0.80mm)", Stock 1=4259407, Supplier 1=Digi-Key, Thickness (Max)="0.035\" (0.90mm)"
C12 C16: library part CMP-0687-00073-1, "Aluminum Electrolytic Capacitor, UD Series, Low Impedance, 100 uF, 50 V, + / - 20%, -55 to 105 degC, Chip Type, 8 x 10 mm D x L, Pb-Free, Reel", Capacitance=100µF, ESR (Equivalent Series Resistance)=-, Lifetime @ Temp.="5000 Hrs @ 105°C", Manufacturer=Nichicon, Operating Temperature="-55°C ~ 105°C", Package / Case="Radial, Can - SMD", Rated Capacitance="100 uF", Rated Ripple Current (at 100kHz)="300 mA", Rated Voltage="50 V", Ripple Current=300mA, Supplier Part Number 1=493-2306-1-ND, Tolerance=±20%, Tolerance Rated Capacitance="-20 to 20%", Voltage Rating=50V, Applications="General Purpose", Category=Capacitors, ComponentLink1Description="Manufacturer URL", ComponentLink1URL=http://www.nichicon.co.jp/, ComponentLink2Description=Datasheet, ComponentLink2URL=http://products.nichicon.co.jp/en/pdf/XJA043/e-ud.pdf, ComponentLink3Description="Package Specification", ComponentLink3URL=http://products.nichicon.co.jp/en/pdf/XJA043/e-ud.pdf, ComponentLink4Description=http://nichicon-us.com/english/products/pdfs/e-uud.pdf, ComponentLink4URL=http://nichicon-us.com/english/products/pdfs/e-uud.pdf, DatasheetVersion=08/2012, Diameter="8 mm", Endurance Time="5000 h", Height - Seated (Max)="0.394\" (10.00mm)", Impedance="0.34 Ohm", Lead Spacing=-, Length="10 mm", Manufacturer Part Number=UUD1H101MNL1GS, Mounting Technology="Surface Mount", Mounting Type="Surface Mount", PackageDescription="2-Pin Surface Mount Device, Diameter 8 mm, Height 10 mm, Pitch 6.5 mm", PackageReference=CAPAE-D8H10, Packaging="Cut Tape (CT)", Packing="Dia382mm Reel", PartNumber=UUD1H101MNL1GS, Part Status=Active, Polarization=Polar, Pricing 1="1=0.92, 10=0.685, 25=0.5868, 50=0.5478, 100=0.4696, 250=0.43044 (CAD)", RoHS=TRUE, Size / Dimension="0.315\" Dia (8.00mm)", Stock 1=65948, Supplier 1=Digi-Key, Surface Mount Land Size="0.327\" L x 0.327\" W (8.30mm x 8.30mm)"
C13 C17: "Capacitor", Capacitance=22µF, Manufacturer=Yageo, Manufacturer Part Number=CC1210MKX5R8BB226, Operating Temperature="-55°C ~ 85°C", Package / Case="1210 (3225 Metric)", Ratings=-, Supplier Part Number 1=311-2056-1-ND, Temperature Coefficient=X5R, Tolerance=±20%, Voltage - Rated=25V, Applications="General Purpose", Category=Capacitors, ComponentLink1Description=http://www.yageo.com/documents/recent/UPY-GPHC_X5R_4V-to-50V_23.pdf, ComponentLink1URL=http://www.yageo.com/documents/recent/UPY-GPHC_X5R_4V-to-50V_23.pdf, Failure Rate=-, Features=-, Height - Seated (Max)=-, Lead Spacing=-, Lead Style=-, Mounting Type="Surface Mount, MLCC", Packaging="Cut Tape (CT)", Part Status=Active, Pricing 1="1=1, 10=0.703, 25=0.5996, 50=0.5314, 100=0.4628, 250=0.39424 (CAD)", RoHS="RoHS Compliant", Size / Dimension="0.126\" L x 0.098\" W (3.20mm x 2.50mm)", Stock 1=128, Supplier 1=Digi-Key, Thickness (Max)="0.110\" (2.80mm)"
C14 C18: "Capacitor", Capacitance=10µF, Manufacturer=Yageo, Manufacturer Part Number=CC1210ZKY5V8BB106, Operating Temperature="-30°C ~ 85°C", Package / Case="1210 (3225 Metric)", Ratings=-, Supplier Part Number 1=311-2063-1-ND, Temperature Coefficient="Y5V (F)", Tolerance="-20%, +80%", Voltage - Rated=25V, Applications="General Purpose", Category=Capacitors, ComponentLink1Description=http://www.yageo.com/documents/recent/UPY-GPHC_Y5V_6.3V-to-50V_7.pdf, ComponentLink1URL=http://www.yageo.com/documents/recent/UPY-GPHC_Y5V_6.3V-to-50V_7.pdf, Failure Rate=-, Features=-, Height - Seated (Max)=-, Lead Spacing=-, Lead Style=-, Mounting Type="Surface Mount, MLCC", Packaging="Cut Tape (CT)", Part Status=Active, Pricing 1="1=0.47, 10=0.323, 25=0.258, 50=0.2154, 100=0.1829, 250=0.14528, 500=0.12912, 1000=0.11298 (CAD)", RoHS="RoHS Compliant", Size / Dimension="0.126\" L x 0.098\" W (3.20mm x 2.50mm)", Stock 1=1156, Supplier 1=Digi-Key, Thickness (Max)="0.083\" (2.10mm)"
C15 C26 C27 C28 C29 C30 C31 C34 C35 C36 C37 C38: "Capacitor", Capacitance=0.10µF, Manufacturer=Yageo, Manufacturer Part Number=CC0603KRX7R9BB104, Operating Temperature="-55°C ~ 125°C", Package / Case="0603 (1608 Metric)", Ratings=-, Supplier Part Number 1=311-1344-1-ND, Temperature Coefficient=X7R, Tolerance=±10%, Voltage - Rated=50V, Applications="General Purpose", Category=Capacitors, ComponentLink1Description=http://www.yageo.com/documents/recent/UPY-GPHC_X7R_6.3V-to-50V_16.pdf, ComponentLink1URL=http://www.yageo.com/documents/recent/UPY-GPHC_X7R_6.3V-to-50V_16.pdf, Failure Rate=-, Features=-, Height - Seated (Max)=-, Lead Spacing=-, Lead Style=-, Mounting Type="Surface Mount, MLCC", Packaging="Cut Tape (CT)", Part Status=Active, Pricing 1="1=0.15, 10=0.043, 25=0.0312, 50=0.0232, 100=0.0189, 250=0.0158, 500=0.01346, 1000=0.01059 (CAD)", RoHS="RoHS Compliant", Size / Dimension="0.063\" L x 0.031\" W (1.60mm x 0.80mm)", Stock 1=4016262, Supplier 1=Digi-Key, Thickness (Max)="0.035\" (0.90mm)"
C19 C24: library part CMP-2000-06092-1, "Chip Capacitor, 100 nF, +/- 10%, 50 V, -55 to 125 degC, 0603 (1608 Metric), RoHS, Tape and Reel", Dielectric=X7R, Manufacturer=SamsungElectro-Mechanics, Operating Temperature=-55to125°C, Package/Case=0603, Package Description="2-Pin Surface Mount Device, Body 1.60 x 0.80 mm", Tolerance=10%, Voltage=50Vdc, Capacitance Value=0.1uF, Category=CapacitorCeramicMultilayer, Construction=Flat, Datasheet URL=http://www.samsungsem.com/kr/support/product-search/mlcc/__icsFiles/afieldfile/2016/08/18/S_CL10B104KB8SFNC.pdf, Datasheet Version=06/2016, Manufacturer URL=http://www.samsungsem.com/global/index.jsp, Mounting=SurfaceMount, Mounting Technology=SurfaceMount, Package Reference=0603, Packaging=Tape&Reel, Product Depth=0.8mm, Product Height=0.8mm, Product Length=1.6mm, Rad Hard=No
C20 C21 C33: "Capacitor", Capacitance=0.47µF, Manufacturer=Yageo, Manufacturer Part Number=CC0603KRX7R8BB474, Operating Temperature="-55°C ~ 125°C", Package / Case="0603 (1608 Metric)", Ratings=-, Supplier Part Number 1=311-1805-1-ND, Temperature Coefficient=X7R, Tolerance=±10%, Voltage - Rated=25V, Applications="General Purpose", Category=Capacitors, ComponentLink1Description=http://www.yageo.com/documents/recent/UPY-GPHC_X7R_6.3V-to-50V_16.pdf, ComponentLink1URL=http://www.yageo.com/documents/recent/UPY-GPHC_X7R_6.3V-to-50V_16.pdf, Failure Rate=-, Features=-, Height - Seated (Max)=-, Lead Spacing=-, Lead Style=-, Mounting Type="Surface Mount, MLCC", Packaging="Cut Tape (CT)", Part Status=Active, Pricing 1="1=0.22, 10=0.158, 25=0.1156, 50=0.0898, 100=0.0745, 250=0.06168, 500=0.05226, 1000=0.04324 (CAD)", RoHS="RoHS Compliant", Size / Dimension="0.063\" L x 0.031\" W (1.60mm x 0.80mm)", Stock 1=11076, Supplier 1=Digi-Key, Thickness (Max)="0.035\" (0.90mm)"
C32: "Capacitor", Capacitance=1000pF, Manufacturer=Yageo, Manufacturer Part Number=CC0603KRX7R9BB102, Operating Temperature="-55°C ~ 125°C", Package / Case="0603 (1608 Metric)", Ratings=-, Supplier Part Number 1=311-1080-1-ND, Temperature Coefficient=X7R, Tolerance=±10%, Voltage - Rated=50V, Applications="General Purpose", Category=Capacitors, ComponentLink1Description=http://www.yageo.com/documents/recent/UPY-GPHC_X7R_6.3V-to-50V_16.pdf, ComponentLink1URL=http://www.yageo.com/documents/recent/UPY-GPHC_X7R_6.3V-to-50V_16.pdf, Failure Rate=-, Features=-, Height - Seated (Max)=-, Lead Spacing=-, Lead Style=-, Mounting Type="Surface Mount, MLCC", Packaging="Cut Tape (CT)", Part Status=Active, Pricing 1="1=0.15, 10=0.029, 25=0.0212, 50=0.0158, 100=0.0129, 250=0.01084, 500=0.00928, 1000=0.00729 (CAD)", RoHS="RoHS Compliant", Size / Dimension="0.063\" L x 0.031\" W (1.60mm x 0.80mm)", Stock 1=783486, Supplier 1=Digi-Key, Thickness (Max)="0.035\" (0.90mm)"
CN1: "Levyseal 90 degree 39 pin header"
D1: library part "LED - CLX6F-FKC-CNP1ST1E1BB7D3D3", "Red, Green, Blue (RGB) 622nm Red, 530nm Green, 470nm Blue LED Indication - Discrete 2.1V Red, 2.7V Green, 3V Blue 6-SMD, J-Lead", ComponentLink1Description=Digikey, ComponentLink1URL=https://www.digikey.ca/product-detail/en/cree-inc/CLX6F-FKC-CNP1ST1E1BB7D3D3/CLX6F-FKC-CNP1ST1E1BB7D3D3CT-ND/6362814
D2: Part Number=SMBJ5338B, Power=5W, Reverse Voltage=5.1V
D3 D8 D13 D15 D16 D20: library part CMP-0931-00026-1, "Small Signal Zener Diode, 3.3 V +/- 5%, -55 to 155 degC, 2-Pin SOD-123, RoHS, Tape and Reel", Current - Reverse Leakage @ Vr="25µA @ 1V", Manufacturer="Vishay Semiconductor", Manufacturer Part Number=MMSZ5226B-7-F, Operating Temperature="-55 to 150 degC", Package / Case=SOD-123, Power - Max=500mW, Power Dissipation (mW)=500, Supplier Part Number 1=MMSZ5226B-FDICT-ND, Test Current (IZT1) (mA)=20, Tolerance="+/- 5%", Voltage - Forward (Vf) (Max) @ If="900mV @ 10mA", Voltage - Zener (Nom) (Vz)=3.3V, Zener Voltage (NOM.) (V)=3.3, Category="Discrete Semiconductor Products", ComponentLink1Description="Manufacturer URL", ComponentLink1URL=http://www.vishay.com/, ComponentLink2Description=Datasheet, ComponentLink2URL=http://www.vishay.com/docs/85774/mmsz5225.pdf, ComponentLink3Description="Package Specification", ComponentLink3URL=http://www.vishay.com/docs/85774/mmsz5225.pdf, ComponentLink4Description=http://www.diodes.com/_files/datasheets/ds18010.pdf, ComponentLink4URL=http://www.diodes.com/_files/datasheets/ds18010.pdf, DatasheetVersion="Rev. 1.9", Impedance (Max) (Zzt)="28 Ohm", Int. Construction=Single, Mounting Technology="Surface Mount", Mounting Type="Surface Mount", PackageDescription="2-Pin SMD, Body 2.7 x 1.55 mm, Height 1.35 mm", PackageReference=SOD-123-2, PackageVersion="Rev. 1.9", Packaging="Cut Tape (CT)", Packing="Tape and Reel", PartNumber=MMSZ5226B-E3-08, Part Status=Active, Pricing 1="1=0.29, 10=0.263, 100=0.1426, 500=0.08778, 1000=0.05985 (CAD)", RoHS=TRUE, Stock 1=45935, Supplier 1=Digi-Key, Supplier Device Package=SOD-123, Zener Impedance (IZT1) (Max.) (Ohm)=28
D4 D21: library part CMP-1063-00165-1, "Dual Line CAN Bus Protector, 3-Pin SOT-23, Tape and Reel", Manufacturer="On Semiconductor", C Max (pF)=30, ComponentLink1Description="Manufacturer URL", ComponentLink1URL=http://www.onsemi.com/, ComponentLink2Description=Datasheet, ComponentLink2URL=http://www.onsemi.cn/pub_link/Collateral/NUP2105L-D.PDF, ComponentLink3Description="Package Specification", ComponentLink3URL=http://www.onsemi.cn/pub_link/Collateral/318-08.PDF, DatasheetVersion="Rev. 5", Direction=Bidirectional, IR Max (uA)=0.1, Mounting Technology="Surface Mount", Number of Lines=2, PackageDescription="3-Pin Small Outline Transistor, Body 2.92 x 1.3 mm, Pitch 0.95 mm", PackageReference=SOT-23-3-318-08, PackageVersion="Rev. AP, 11/2009", Packing="Tape and Reel", PartNumber=NUP2105LT1, PPK Max (W)=350, V(BR) Min (V)=26.2
D5 D6 D9 D10 D11 D18 D23: library part CMP-1063-00171-1, "Low Capacitance Diode Array for ESD Protection in a Single Data Line, 3-Pin SOT-23, Pb-Free, Tape and Reel", Manufacturer="On Semiconductor", Supplier Part Number 1=863-SZNUP1301ML3T1G, C Max (pF)=0.9, ComponentLink1Description="Manufacturer URL", ComponentLink1URL=http://www.onsemi.com/, ComponentLink2Description=Datasheet, ComponentLink2URL=http://www.onsemi.cn/pub_link/Collateral/NUP1301ML3T1-D.PDF, ComponentLink3Description="Package Specification", ComponentLink3URL=http://www.onsemi.cn/pub_link/Collateral/318-08.PDF, DatasheetVersion="Rev. 6", Direction=Bidirectional, Mounting Technology="Surface Mount", Number of Lines=1, PackageDescription="3-Pin Small Outline Transistor, Body 2.92 x 1.3 mm, Pitch 0.95 mm", PackageReference=SOT-23-3-318-08, PackageVersion="Rev. AP, 11/2009", Packing="Tape and Reel", PartNumber=SZNUP1301ML3T1G, RoHS=Pb-Free, Supplier 1=Mouser, V(BR) Min (V)=70, VRWM Max (V)=70
D7 D12 D14 D17 D19 D22: library part CMP-0549-00004-1, "Schottky Barrier Rectifier, 40 V Maximum DC Blocking Voltage, -65 to 125 degC, 2-Pin SMA Case, RoHS", Manufacturer="Vishay Semiconductor", Operating Temperature="-65 to 125 degC", Supplier Part Number 1=SS14CT-ND, ComponentLink1Description="Manufacturer URL", ComponentLink1URL=http://www.vishay.com/, ComponentLink2Description=Datasheet, ComponentLink2URL=http://www.vishay.com/docs/88746/ss12.pdf, ComponentLink3Description="Package Specification", ComponentLink3URL=http://www.vishay.com/docs/88746/ss12.pdf, DatasheetVersion=12/17/2012, IF(AV)="1 A Max.", IFSM="40 A", Mounting Technology="Surface Mount", PackageDescription="2-Pin SMD, Body 4.245 x 2.665 mm, Height 2.29 mm", PackageReference=DO-214AC-2, PackageVersion=Dec-12, PartNumber=SS14-E3/5AT, RoHS=TRUE, Supplier 1=Digi-Key, VDC="40 V Max.", VRMS="28 V Max.", VRRM="40 V Max."
DS1 DS2: library part CMP-1674-00002-5, "LED Uni-Color Green, 100 mW, 120 mA, -55 to 85 degC, 2-Pin SMD, RoHS, Tape and Reel", Color=Green, Current - Test=10mA, Lens Color=Colorless, Manufacturer=Lite-On, Max Operating Temperature="85 degC", Millicandela Rating=6mcd, Min Operating Temperature="-55 degC", Package / Case="0805 (2012 Metric)", Package Quantity=1, Supplier Device Package=-, Supplier Part Number 1=160-1179-1-ND, Voltage - Forward (Vf) (Typ)=2.1V, Category=Optoelectronics, Colour=Green, ComponentLink1Description="Manufacturer URL", ComponentLink1URL=http://www.us.liteon.com/, ComponentLink2Description=Datasheet, ComponentLink2URL=http://media.digikey.com/pdf/Data%20Sheets/Lite-On%20PDFs/LTST-C170GKT.pdf, DatasheetVersion=03/2003, Features=-, Height="1.1 mm", Height (Max)=1.10mm, Length="2 mm", Lens Style/Size="Rectangle with Flat Top, 1.40mm x 1.25mm", Lens Transparency=Clear, Manufacturer Part Number=LTST-C170GKT, Mount="Surface Mount", Mounting Technology="Surface Mount", Mounting Type="Surface Mount", PackageDescription="2-Pin Surface Mount Device, Body 2 x 1.25 mm", PackageReference=C170GKT, Packaging="Tape and Reel", Part Status=Active, Pins=2, Pricing 1="1=0.48, 10=0.351, 25=0.2588, 100=0.1848, 250=0.12564, 500=0.11086, 1000=0.08684 (CAD)", RoHS="RoHS Compliant", RoHSCompliant=true, Size / Dimension="2.00mm L x 1.25mm W", Stock 1=242288, Supplier 1=Digi-Key, Viewing Angle=130°, Wavelength - Dominant=569nm, Wavelength - Peak=565nm
F1 F2 F3 F5 F6 F7: library part "PTC fuse 80mA 0ZCM0008FF2G", "0ZCM0008FF2G", Supplier Part Number 1=507-1817-1-ND, Supplier 1=Digi-Key
F8 F11: library part CMP-2000-05510-1, "Poly-Fuse(R) Resettable PTC, 24 V, 100 A, -40 to 85 degC, 2-Pin SMD, RoHS, Tape and Reel", Current Rating=100A, Hold Current=0.75A, Manufacturer=Littelfuse, Maximum Voltage=24VDC, Maximum Voltage DC=24V, Operating Temperature Range=-40Cto+85C, Package / Case=1812(4532metric), Package Description="2-Pin Surface Mount Device, Body 4.55 x 3.24 mm", Package Reference=1812L07524DR, Resistance=290mOhms, Trip Current=1.5A, Brand=Littelfuse, Current Rating (Max)=100A, Current Rating - Max=100A, Datasheet URL=http://www.littelfuse.com/~/media/electronics/datasheets/resettable_ptcs/littelfuse_ptc_1812l_datasheet.pdf.pdf, Datasheet Version=02/2016, Dimensions=4.37mmLx3.07mmWx0.75mmH, Factory Pack Quantity=1500, Manufacturer URL=http://www.littelfuse.com/, Mounting Style=SMD/SMT, Mounting Technology=SurfaceMount, Packaging=Reel, Product Category=ResettableFuses-PPTC, RoHS=Details, Series=1812L, Termination Style=SMD/SMT, Type=PolyFuseResettablePTC
F9 F10: library part CMP-2000-05508-1, "PTC Resettable Fuse, 0.8 W, 30 V, -40 to 85 degC, 2-Pin SMD, RoHS, Tape and Reel", Current - Hold (Ih) (Max)=500mA, Current - Max=100A, Current - Trip (It)=1A, Manufacturer=Littelfuse-Inc., Package / Case=1812(4532Metric),Concave, Package Description="2-Pin Surface Mount Device, Body 4.55 x 3.24 mm", Package Reference=1812, Voltage - Max=30V, Category=CircuitProtection, Datasheet URL=http://www.littelfuse.com/~/media/electronics/datasheets/resettable_ptcs/littelfuse_ptc_1812l_datasheet.pdf.pdf, Datasheet Version=02/2016, Family=PTCResettableFuses, Manufacturer URL=http://www.littelfuse.com/, Mounting Technology=SurfaceMount, Packaging=Tape&Reel(TR), R Min/Max=0.150~1.000Ohm, Series=POLY-FUSE®,1812L, Time to Trip=0.15s
IReg1 IReg2 IReg3 IReg4: library part "LED Currnet Driver, 500mA, 30V max", Current - Output / Channel=500mA, Frequency=-, Manufacturer="ON Semiconductor", Manufacturer Part Number=NUD4001DR2G, Operating Temperature="-40°C ~ 125°C (TA)", Package / Case="8-SOIC (0.154\", 3.90mm Width)", Supplier Device Package=8-SOIC, Supplier Part Number 1=NUD4001DR2GOSCT-ND, Voltage - Output=28V, Voltage - Supply (Max)=30V, Voltage - Supply (Min)=3.6V, Applications="Automotive, Lighting", Category="Integrated Circuits (ICs)", ComponentLink1Description=http://www.onsemi.com/pub_link/Collateral/NUD4001-D.PDF, ComponentLink1URL=http://www.onsemi.com/pub_link/Collateral/NUD4001-D.PDF, Dimming=PWM, Internal Switch(s)=Yes, Mounting Type="Surface Mount", Number of Outputs=1, Packaging="Cut Tape (CT)", Part Status=Active, Pricing 1="1=1.36, 10=1.197, 100=0.9174, 500=0.72524, 1000=0.58019 (CAD)", RoHS="RoHS Compliant", Stock 1=212669, Supplier 1=Digi-Key, Topology=-, Type=Linear
L1: library part CMP-2000-06698-1, "Chip Bead, 600 Ohm, 1 A, -55 to 125 degC, 2-Pin SMD (0603), RoHS, Tape and Reel", Current Rating (Max)=1A, DC Resistance (DCR) (Max)=200mOhm, Impedance @ Frequency=600Ohm@100MHz, Manufacturer=Bourns, Operating Temperature=-55°C~125°C, Package / Case=0603(1608Metric), Package Description="2-Pin Surface Mount Device, Body 1.6 x 0.8 mm", Package Reference=0603, Ratings=-, Standard Package=1, Supplier Part Number 1=240-2371-1-ND, Category=Filters, Datasheet URL=http://www.bourns.com/docs/Product-Datasheets/mh.pdf, Datasheet Version=03/2015, EDA / CAD Models=DownloadfromAcceleratedDesigns, Family=FerriteBeadsandChips, Filter Type=Power,SignalLine, Manufacturer URL=http://www.bourns.com/, Mounting Technology=SurfaceMount, Mounting Type=SurfaceMount, Number of Lines=1, Online Catalog=MHSeries, Other Names=MH1608-601YCT, Packaging=CutTape(CT), RoHS Information=MH1608SeriesMaterialDeclaration, Series=MH, Supplier 1=Digi-Key
P1 P2: "Header, 2-Pin", LatestRevisionDate=17-Jul-2002, LatestRevisionNote="Re-released for DXP Platform.", Publisher="Altium Limited"
Q1: library part CMP-2100-03638-1, "Single P-Channel, Logic Level, PowerTrench(R) MOSFET, 2 A, 20 V, -55 to 150 degC, 3-Pin SOT-23, RoHS, Tape and Reel", Case/Package=SOT-23, Continuous Drain Current (ID)=2A, Current Rating=-2A, Drain to Source Breakdown Voltage=-20V, Drain to Source Resistance=60mOhm, Drain to Source Voltage (Vdss)=20V, Gate to Source Voltage (Vgs)=8V, Input Capacitance=779pF, Manufacturer="Fairchild Semiconductor", Max Operating Temperature=150degC, Max Power Dissipation=500mW, Min Operating Temperature=-55degC, Package Description="3-Pin Small Outline Transistor, Body 2.92 x 1.4 mm, Pitch 0.95 mm", Package Quantity=1, Package Reference=SSOT3L, Package Version="Rev. 3, 05/2015", Threshold Voltage=-800mV, Contact Plating=Tin, Datasheet URL=https://www.fairchildsemi.com/datasheets/FD/FDN340P.pdf, Datasheet Version="Rev. E1, 02/2007", Element Configuration=Single, Fall Time=11ns, Height=0.94mm, Lead Free=LeadFree, Length=2.92mm, Manufacturer URL=https://www.fairchildsemi.com/, Mount=SurfaceMount, Number of Elements=1, Number of Pins=3, Package URL=https://www.fairchildsemi.com/package-drawings/MA/MA03B.pdf, Packaging=TapeandReel, Power Dissipation=500mW, Radiation Hardening=No, Rds On Max=70mOhm, REACH SVHC=NoSVHC, Rise Time=9ns, RoHSCompliant=true, Termination=SMD/SMT, Turn-Off Delay Time=27ns, Turn-On Delay Time=10ns, Voltage Rating (DC)=-20V, Width=3.05mm
Q2 Q3 Q4 Q5: library part CMP-1048-00593-1, "General Purpose Transistor, NPN Silicon, 3-Pin SOT-23, Tape and Reel", Manufacturer="On Semiconductor", ComponentLink1Description="Manufacturer URL", ComponentLink1URL=http://www.onsemi.com/, ComponentLink2Description=Datasheet, ComponentLink2URL=http://www.onsemi.cn/pub_link/Collateral/MMBT2222LT1-D.PDF, ComponentLink3Description="Package Specification", ComponentLink3URL=http://www.onsemi.cn/pub_link/Collateral/318-08.PDF, DatasheetVersion="Rev. 10", fT Min (MHz)=300, IC Continuous (A)=0.6, Mounting Technology="Surface Mount", PackageDescription="3-Pin Small Outline Transistor, Body 2.92 x 1.3 mm, Pitch 0.95 mm", PackageReference=SOT-23-3-318-08, PackageVersion="Rev. AP, 11/2009", Packing="Tape and Reel", PartNumber=MMBT2222ALT1, Polarity=NPN, RoHS=FALSE
Q6: library part CMP-2000-06466-1, "HEXFET (R) Power MOSFET, 30 V, -55 to 150 degC, 8-Pin SO, RoHS, Tube", Drain-Source On Resistance-Max=0.011O, Drain-to-Source Voltage [Vdss]=30V, Manufacturer="International Rectifier", Package Description="8-Pin Small Outline Integrated Circuit, Body 4.9 x 3.9 mm, Pitch 1.27 mm", Package Reference=SO-8, Rated Power Dissipation=2.5W, Supplier Part Number 1=IRF7413PBFCT-ND, Channel Type=N-Channel, Datasheet URL=http://www.infineon.com/dgdl/irf7413pbf.pdf?fileId=5546d462533600a4015355fa8e901bb8, Datasheet Version=02/2008, Manufacturer URL=http://internationalrectifier.com/, Mounting Technology=SurfaceMount, Qg Gate Charge=52nC, Supplier 1=Digi-Key
R1: library part CMP-1012-00048-1, "82R 0.1W 5% 0603 (1608 Metric)  SMD", Case-EIA=0603, Case-Metric=1608, Power="0.1 W", Tolerance="5 %", Technology=SMT
R2: library part CMP-1012-00372-1, "60R4 0.1W 1% 0603 (1608 Metric)  SMD", Case-EIA=0603, Case-Metric=1608, Power="0.1 W", Tolerance="1 %", Technology=SMT
R3: library part CMP-1012-00038-1, "33R 0.1W 5% 0603 (1608 Metric)  SMD", Case-EIA=0603, Case-Metric=1608, Power="0.1 W", Tolerance="5 %", Technology=SMT
R4: library part CMP-1012-00098-1, "10K 0.1W 5% 0603 (1608 Metric)  SMD", Case-EIA=0603, Case-Metric=1608, Power="0.1 W", Tolerance="5 %", Technology=SMT
R5 R40 R41 R42 R49 R52 R55 R58: "Resistor", Manufacturer="Panasonic Electronic Components", Manufacturer Part Number=ERJ-PA3F1001V, Operating Temperature="-55°C ~ 155°C", Package / Case="0603 (1608 Metric)", Power (Watts)="0.25W, 1/4W", Resistance (Ohms)=1k, Supplier Device Package=0603, Supplier Part Number 1=P1.0KBYCT-ND, Temperature Coefficient=±100ppm/°C, Tolerance=±1%, Category=Resistors, ComponentLink1Description=https://industrial.panasonic.com/cdbs/www-data/pdf/RDA0000/AOA0000C243.pdf, ComponentLink1URL=https://industrial.panasonic.com/cdbs/www-data/pdf/RDA0000/AOA0000C243.pdf, Composition="Thick Film", Failure Rate=-, Features="Automotive AEC-Q200, Pulse Withstanding", Height - Seated (Max)="0.022\" (0.55mm)", Number of Terminations=2, Packaging="Cut Tape (CT)", Part Status=Active, Pricing 1="1=0.22, 10=0.198, 25=0.138, 50=0.1072, 100=0.0765, 250=0.05972, 500=0.04746, 1000=0.03368 (CAD)", RoHS="RoHS Compliant", Size / Dimension="0.063\" L x 0.031\" W (1.60mm x 0.80mm)", Stock 1=56110, Supplier 1=Digi-Key
R6: "Resistor", Manufacturer=Yageo, Manufacturer Part Number=RC0603JR-07180RL, Operating Temperature="-55°C ~ 155°C", Package / Case="0603 (1608 Metric)", Power (Watts)="0.1W, 1/10W", Resistance (Ohms)=180, Supplier Device Package=0603, Supplier Part Number 1=311-180GRCT-ND, Temperature Coefficient=±100ppm/°C, Tolerance=±5%, Category=Resistors, ComponentLink1Description=http://www.yageo.com/NewPortal/yageodocoutput?fileName=/pdf/R-Chip/PYu-RC_Group_51_RoHS_L_4.pdf, ComponentLink1URL=http://www.yageo.com/NewPortal/yageodocoutput?fileName=/pdf/R-Chip/PYu-RC_Group_51_RoHS_L_4.pdf, Composition="Thick Film", Failure Rate=-, Features="Moisture Resistant", Height - Seated (Max)="0.022\" (0.55mm)", Number of Terminations=2, Packaging="Cut Tape (CT)", Part Status=Active, Pricing 1="1=0.16, 10=0.016, 25=0.0112, 50=0.0084, 100=0.0062, 250=0.0048, 500=0.00382, 1000=0.00281 (CAD)", RoHS="RoHS Compliant", Size / Dimension="0.063\" L x 0.031\" W (1.60mm x 0.80mm)", Stock 1=201936, Supplier 1=Digi-Key
R7: "Resistor", Manufacturer=Yageo, Manufacturer Part Number=RC0603JR-0782RL, Operating Temperature="-55°C ~ 155°C", Package / Case="0603 (1608 Metric)", Power (Watts)="0.1W, 1/10W", Resistance (Ohms)=82, Supplier Device Package=0603, Supplier Part Number 1=311-82GRCT-ND, Temperature Coefficient=±100ppm/°C, Tolerance=±5%, Category=Resistors, ComponentLink1Description=http://www.yageo.com/NewPortal/yageodocoutput?fileName=/pdf/R-Chip/PYu-RC_Group_51_RoHS_L_4.pdf, ComponentLink1URL=http://www.yageo.com/NewPortal/yageodocoutput?fileName=/pdf/R-Chip/PYu-RC_Group_51_RoHS_L_4.pdf, Composition="Thick Film", Failure Rate=-, Features="Moisture Resistant", Height - Seated (Max)="0.022\" (0.55mm)", Number of Terminations=2, Packaging="Cut Tape (CT)", Part Status=Active, Pricing 1="1=0.16, 10=0.016, 25=0.0112, 50=0.0084, 100=0.0062, 250=0.0048, 500=0.00382, 1000=0.00281 (CAD)", RoHS="RoHS Compliant", Size / Dimension="0.063\" L x 0.031\" W (1.60mm x 0.80mm)", Stock 1=72049, Supplier 1=Digi-Key
R8: library part CMP-1014-00050-1, "100R 0.25W 5% 1206 (3216 Metric)  SMD", Case-EIA=1206, Case-Metric=3216, Power="0.25 W", Tolerance="5 %", Technology=SMT
R9 R10 R28 R29: library part CMP-1012-00034-1, "22R 0.1W 5% 0603 (1608 Metric)  SMD", Case-EIA=0603, Case-Metric=1608, Power="0.1 W", Tolerance="5 %", Technology=SMT
R11 R30: library part CMP-1012-00052-1, "120R 0.1W 5% 0603 (1608 Metric)  SMD", Case-EIA=0603, Case-Metric=1608, Power="0.1 W", Tolerance="5 %", Technology=SMT
R12 R16: "Resistor", Manufacturer=Yageo, Manufacturer Part Number=RT0603BRD073K9L, Operating Temperature="-55°C ~ 155°C", Package / Case="0603 (1608 Metric)", Power (Watts)="0.1W, 1/10W", Resistance (Ohms)=3.9k, Supplier Device Package=0603, Supplier Part Number 1=YAG1656CT-ND, Temperature Coefficient=±25ppm/°C, Tolerance=±0.1%, Category=Resistors, ComponentLink1Description=http://www.yageo.com/documents/recent/PYu-RT_1-to-0.05_RoHS_L_6.pdf, ComponentLink1URL=http://www.yageo.com/documents/recent/PYu-RT_1-to-0.05_RoHS_L_6.pdf, Composition="Thin Film", Failure Rate=-, Features="Moisture Resistant", Height - Seated (Max)="0.022\" (0.55mm)", Number of Terminations=2, Packaging="Cut Tape (CT)", Part Status=Active, Pricing 1="1=0.55, 10=0.464, 25=0.3376, 50=0.2446, 100=0.1814, 250=0.1392, 500=0.10966, 1000=0.07592 (CAD)", RoHS="RoHS Compliant", Size / Dimension="0.063\" L x 0.031\" W (1.60mm x 0.80mm)", Stock 1=10688, Supplier 1=Digi-Key